# Altium PCB FURNACE.PcbDoc (part 1 of 2)
Units mm, origin at the board's own origin, x right, y up, seen from the top; angles counter-clockwise.
Board outline 97.9 x 85.9 mm, 2 copper layers (Top Layer, Bottom Layer); 165 components, 104 nets, 476 pads, 472 vias.
Unrouted connection lines stored in the file: 26.
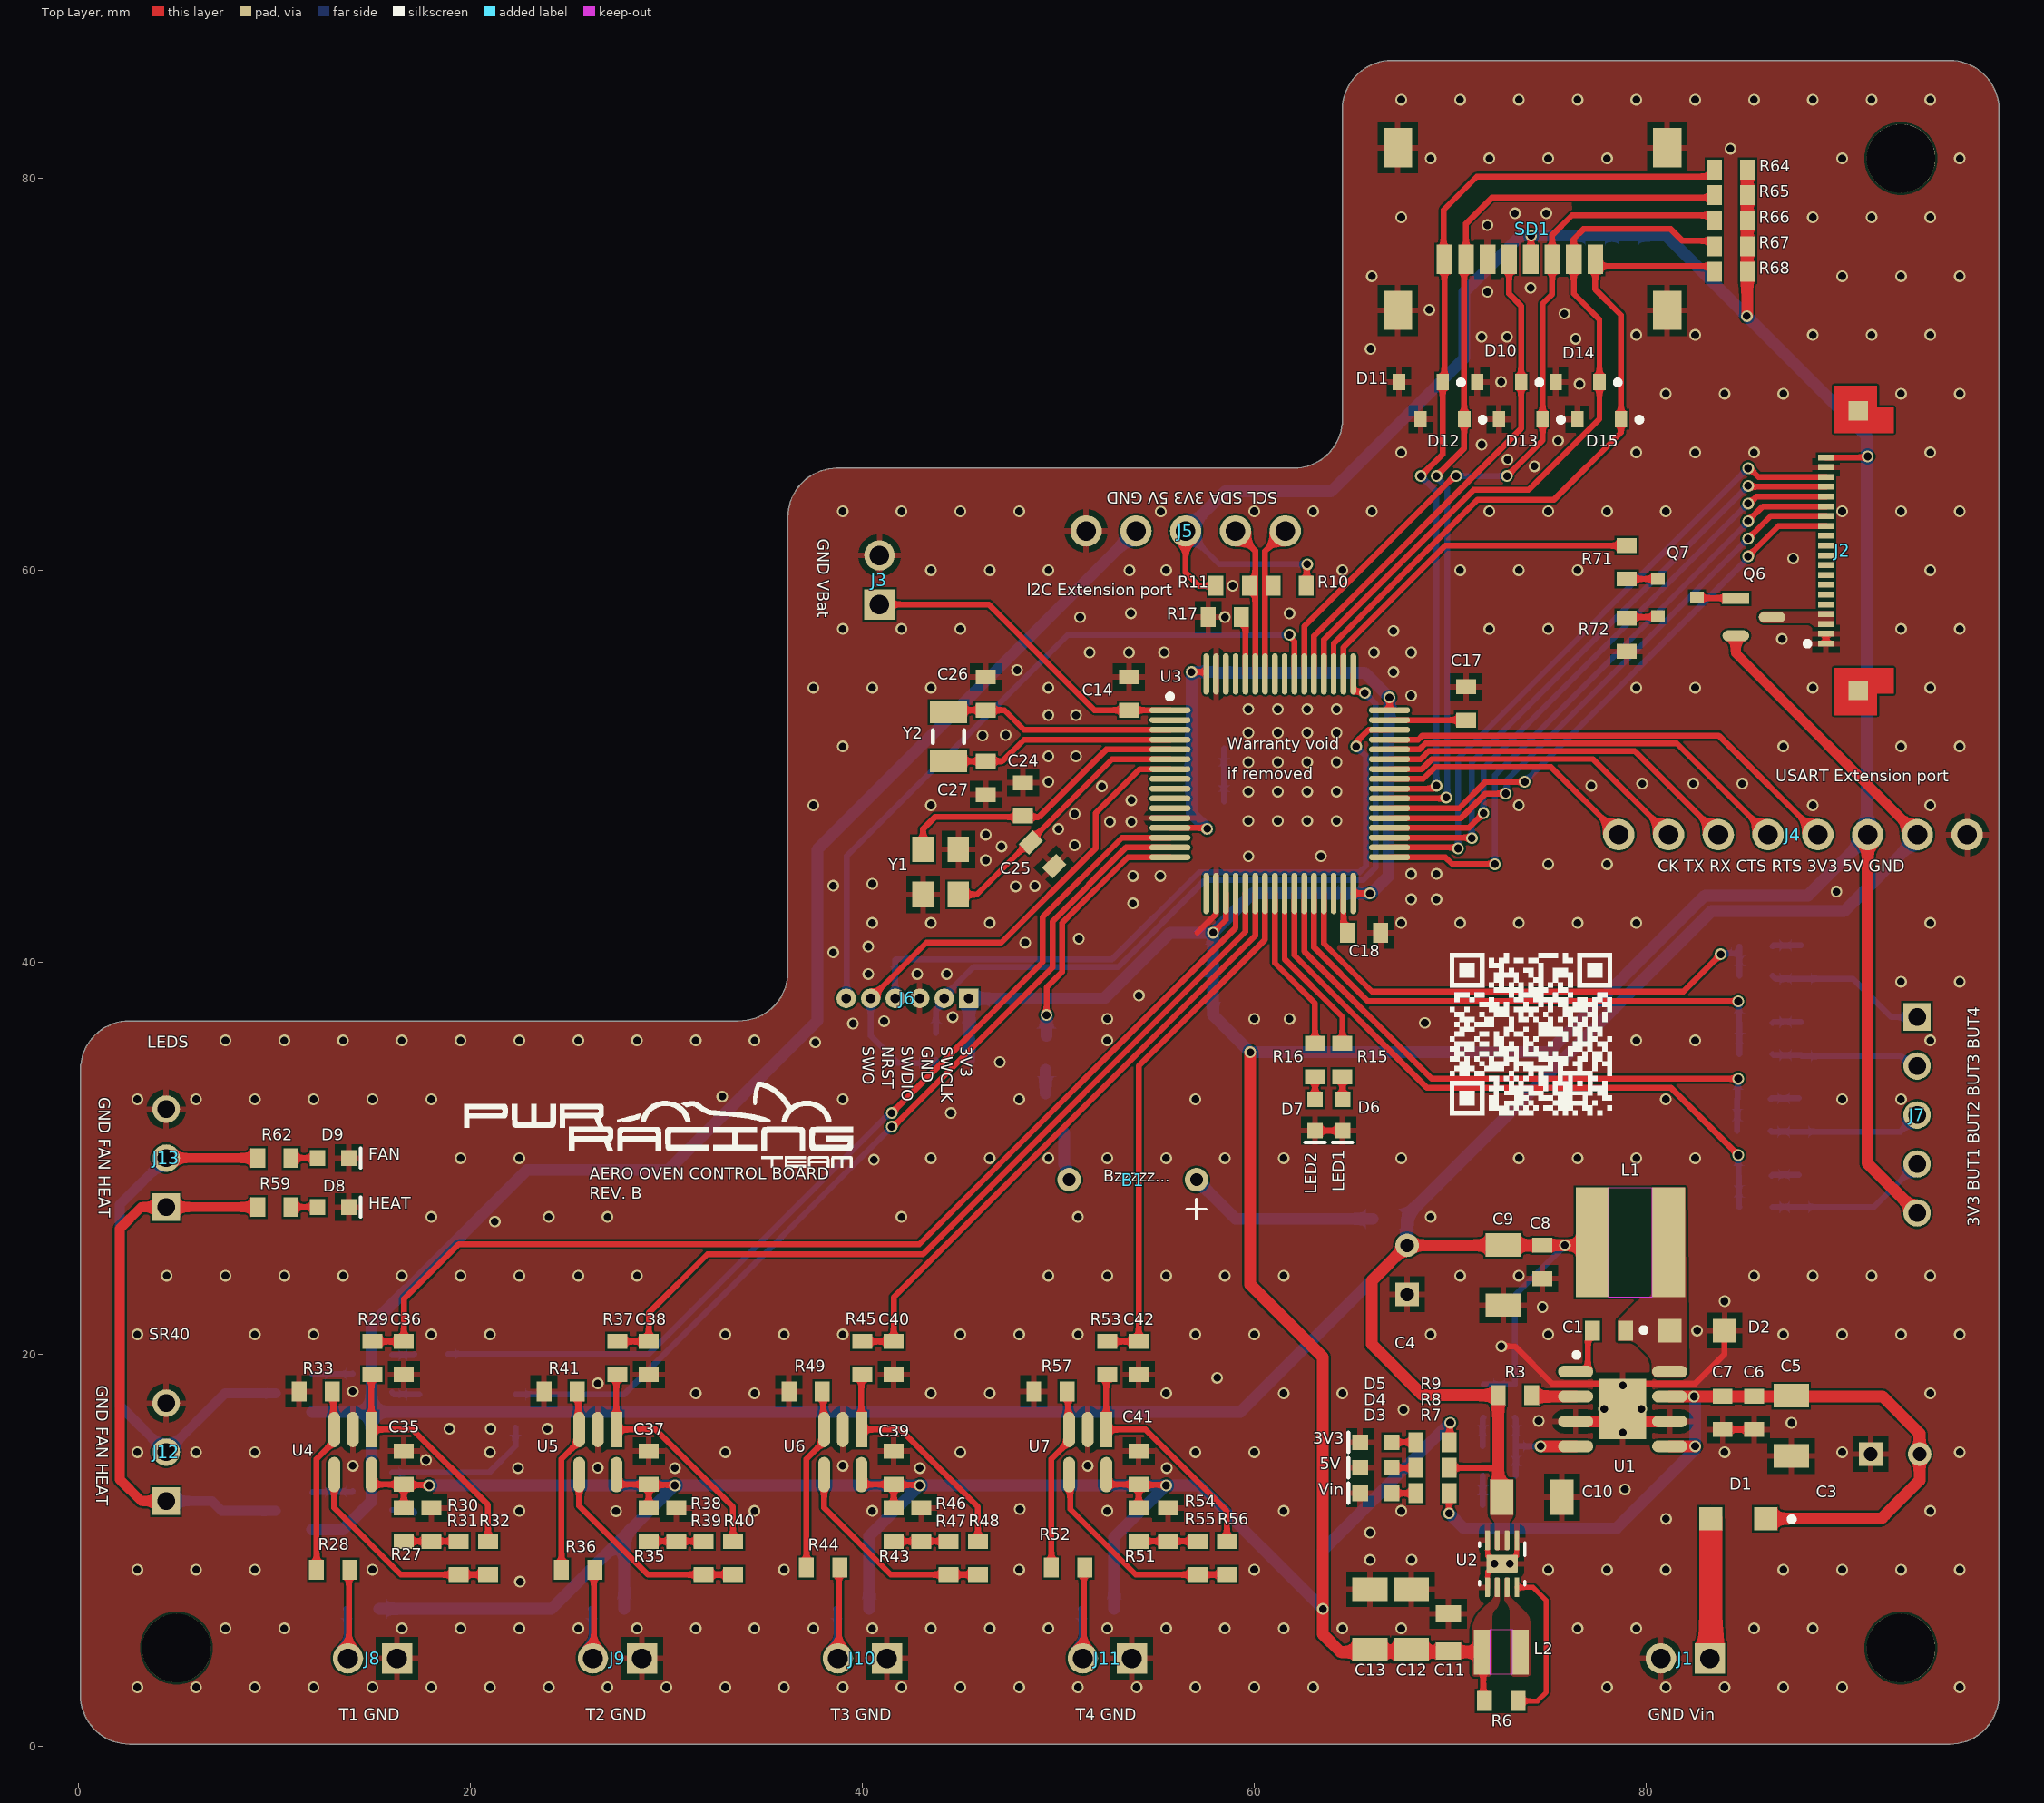
[diagram p0: Top Layer view]
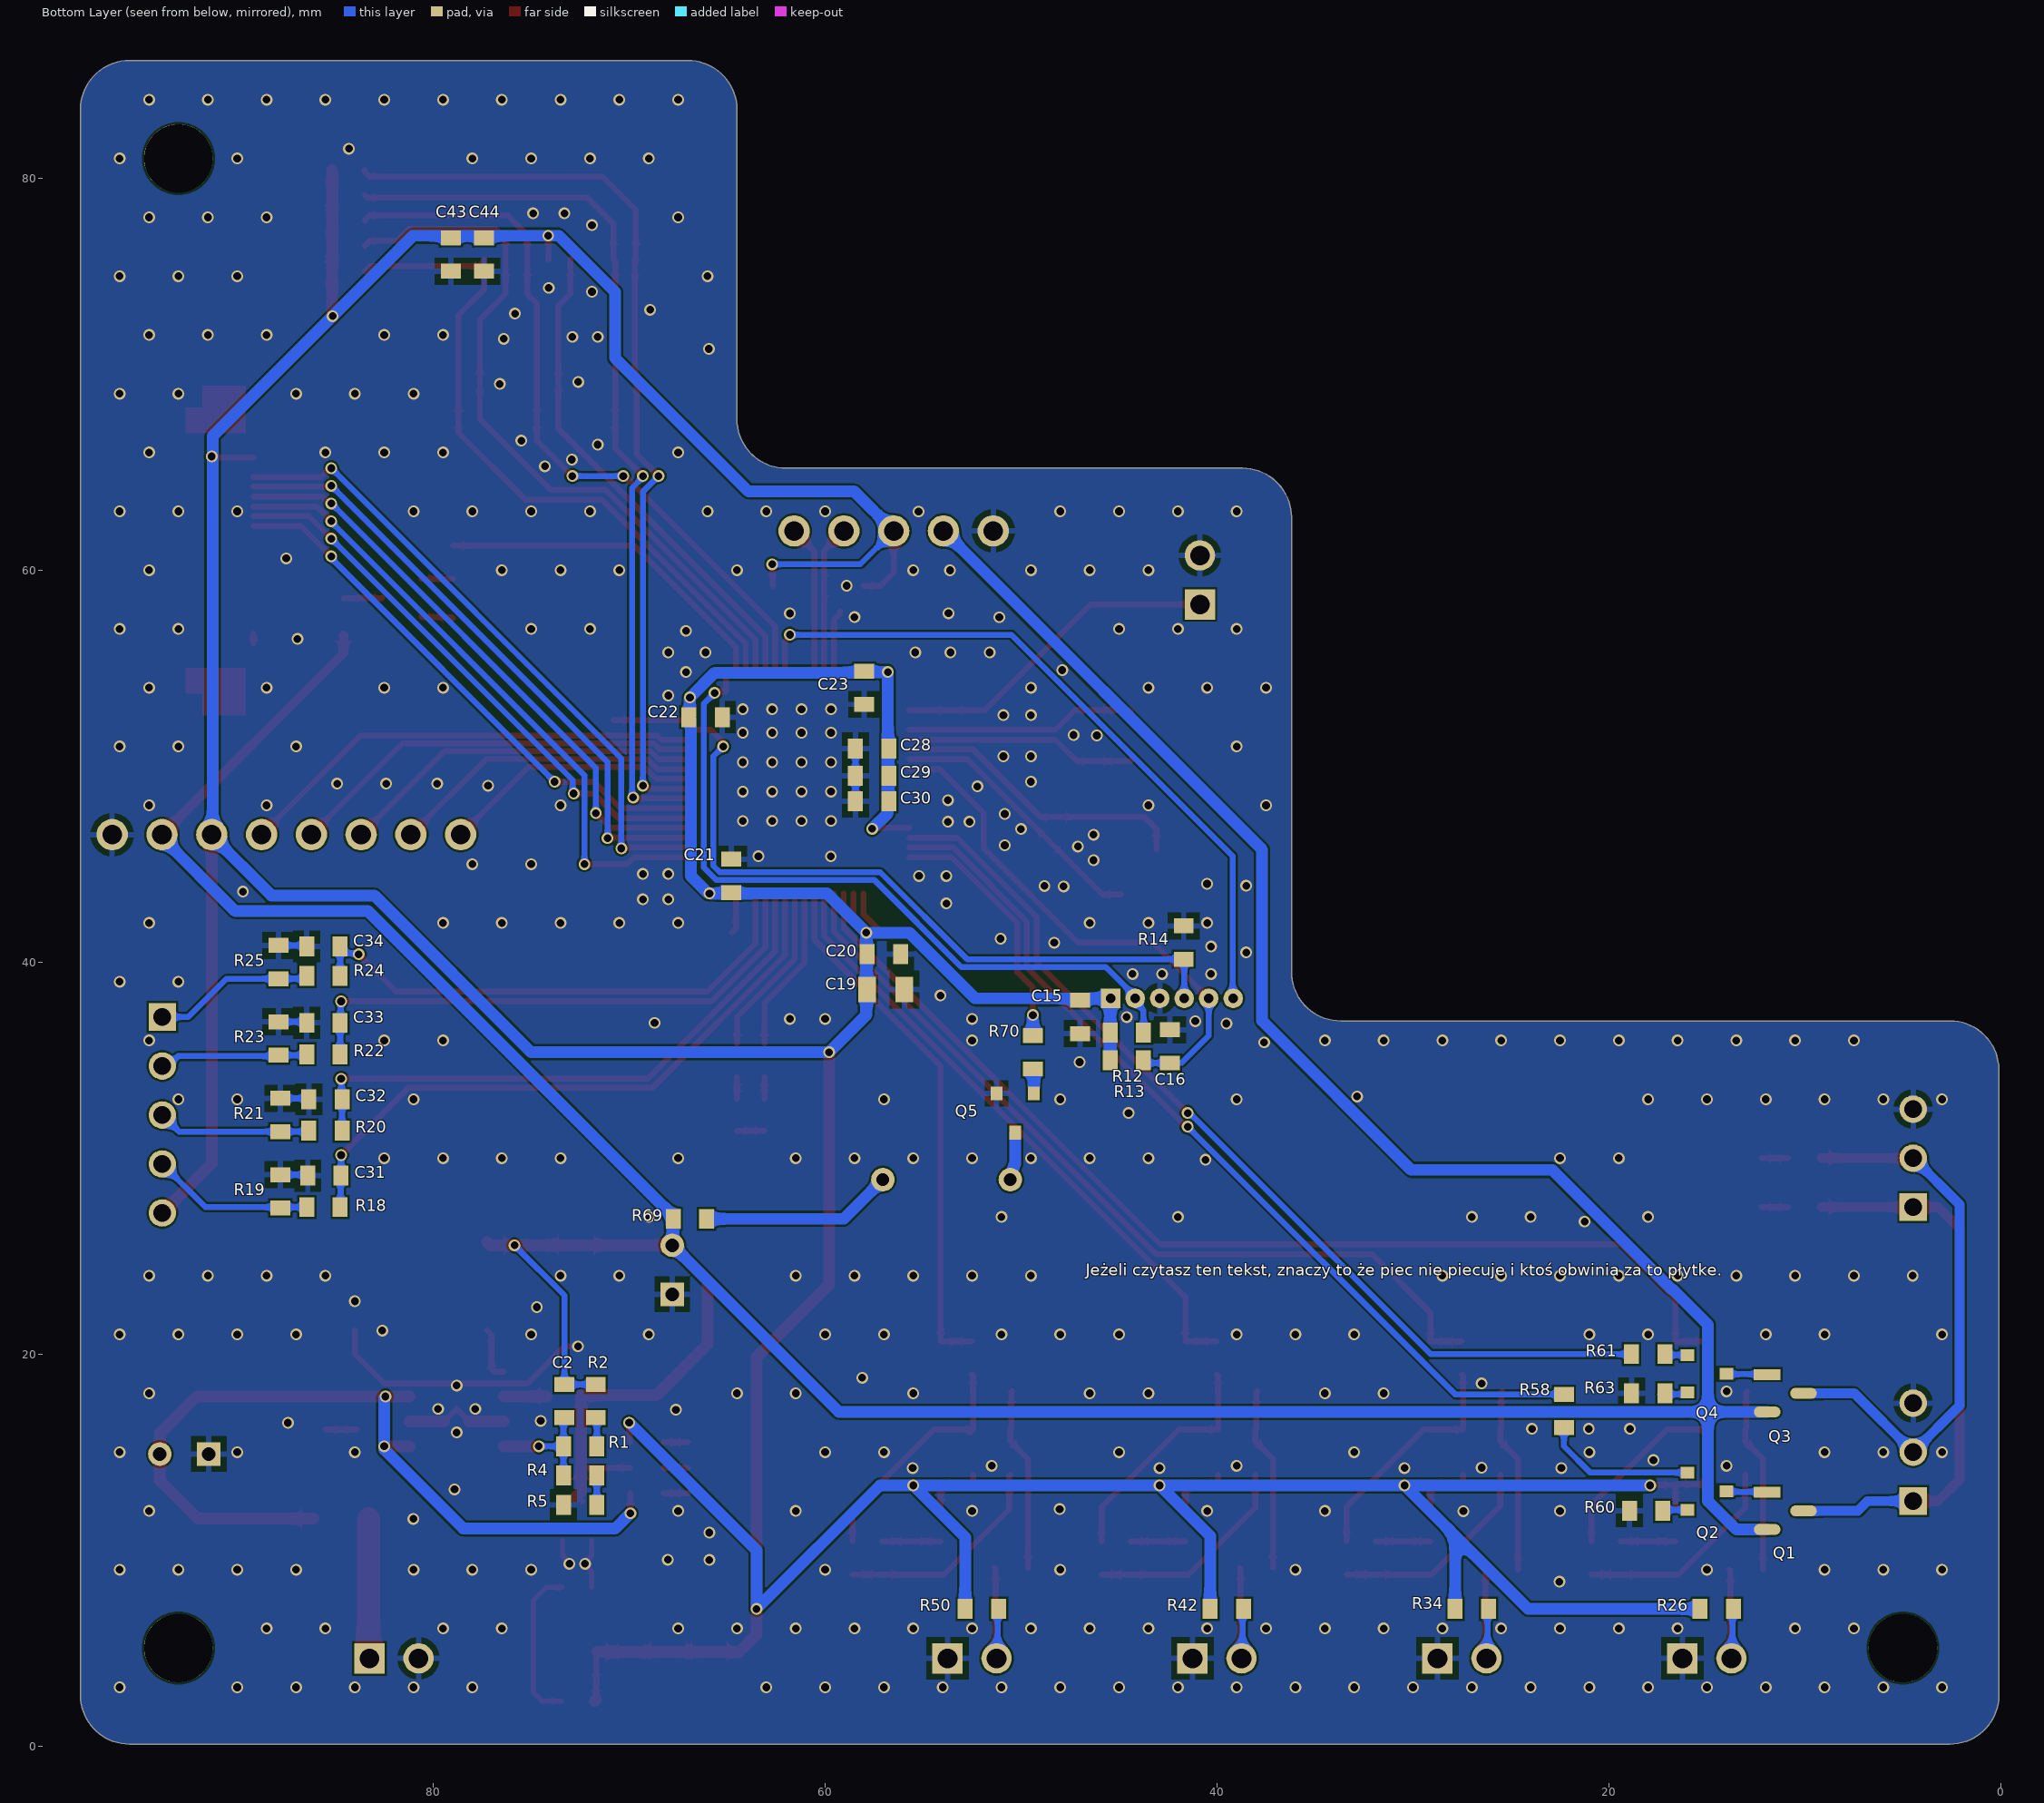
[diagram p1: Bottom Layer view, seen from below]
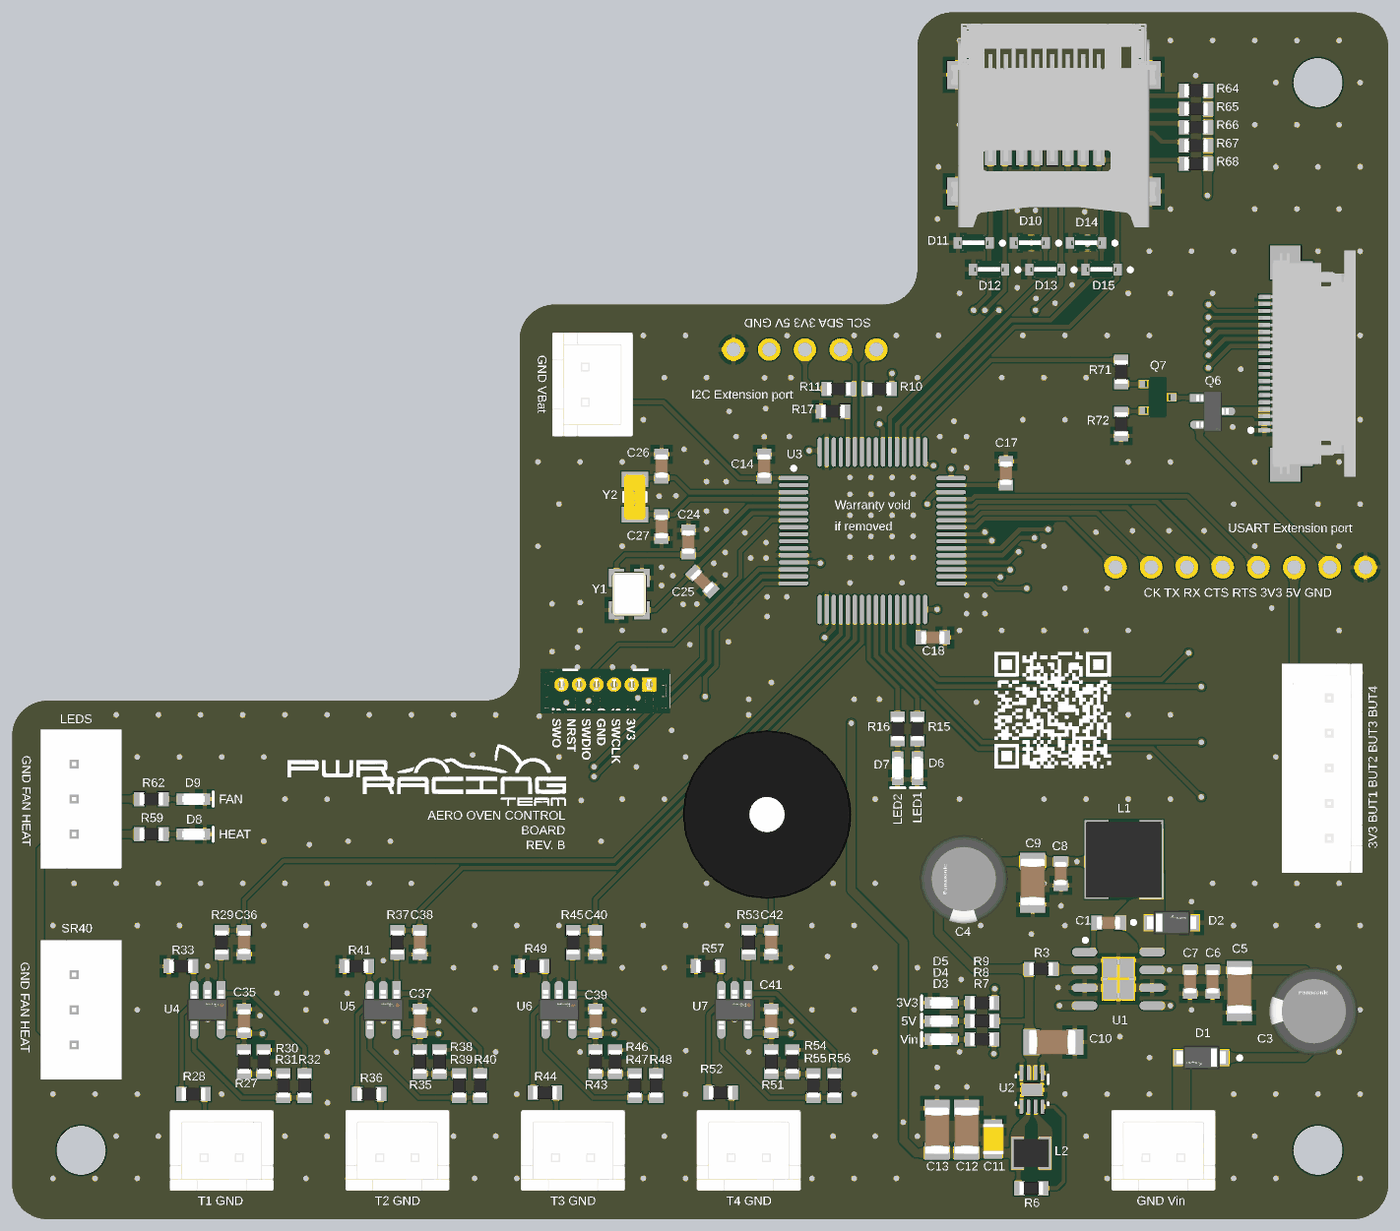
[diagram p3: 3D render of the assembled board from above, using the file's embedded part models]
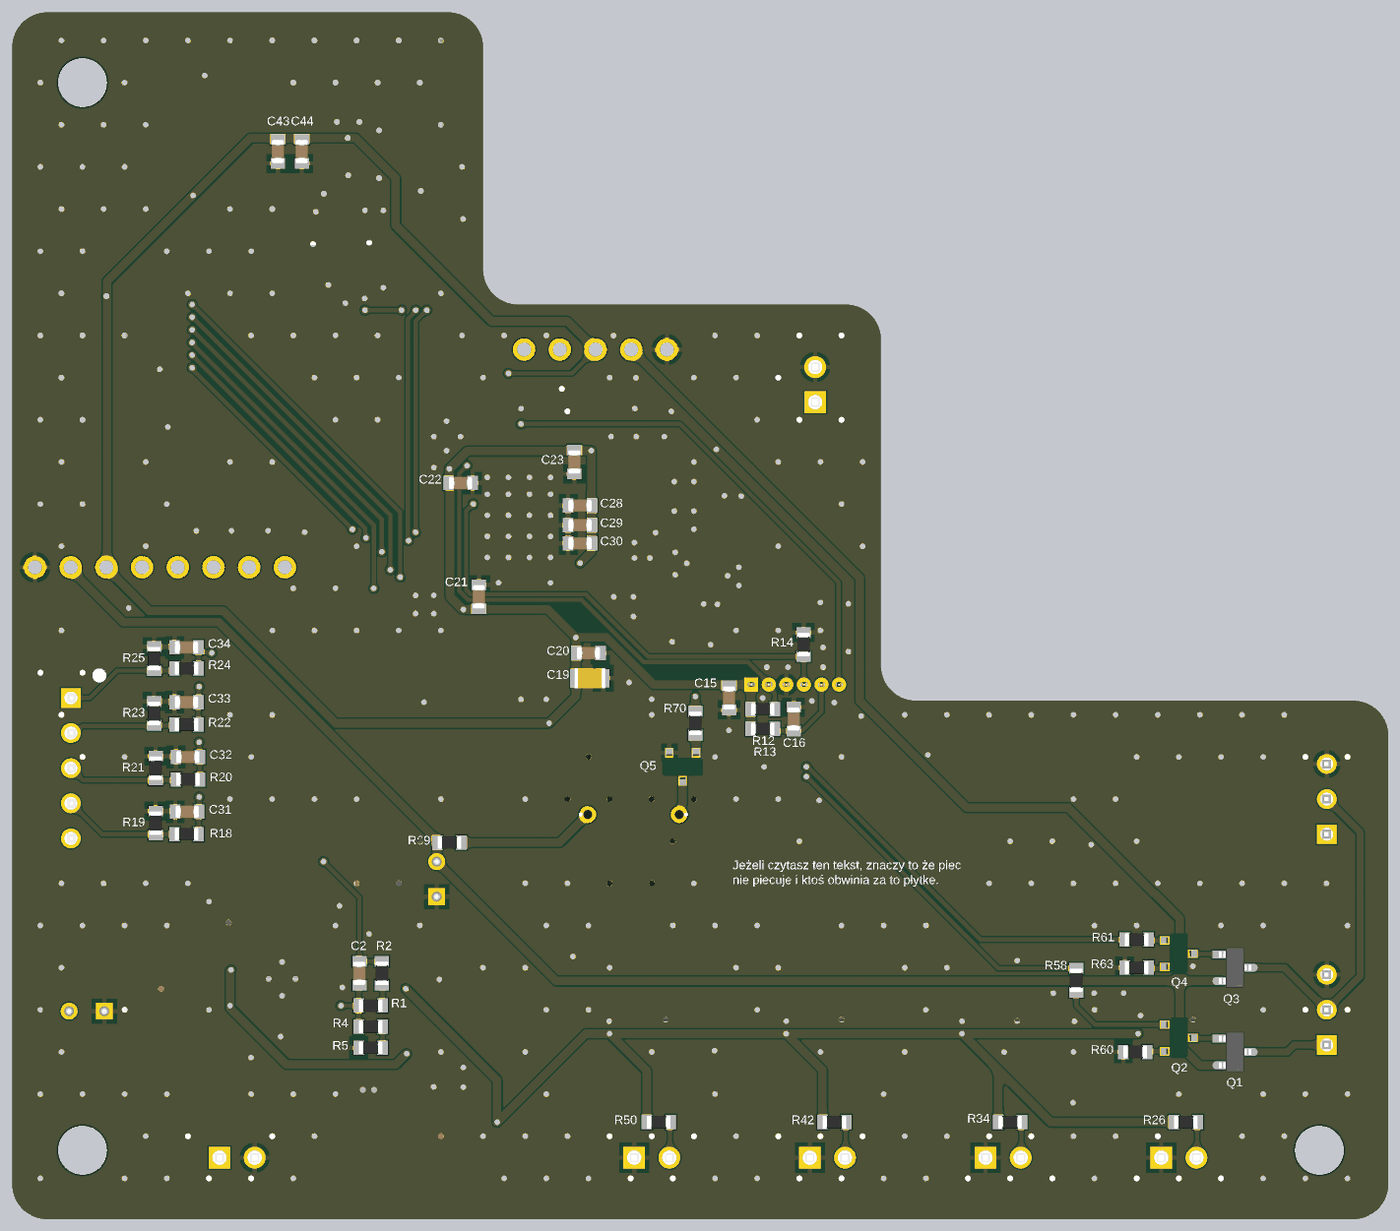
[diagram p4: 3D render of the assembled board from below, using the file's embedded part models]

## Layer stack, top to bottom
Top Solder: solder mask 0.0102, Solder Resist, Dk 3.5
Top Layer: signal copper 0.0356
Dielectric 1: dielectric 0.32, FR-4, Dk 4.8
Bottom Layer: signal copper 0.0356
Bottom Solder: solder mask 0.0102, Solder Resist, Dk 3.5

## Board outline
0.1,2.6 0.1,34.5 cw(c2.6,34.5) 2.6,37 33.7,37 ccw(c33.7,39.5) 36.2,39.5 36.2,62.7 cw(c38.7,62.7) 38.7,65.2 62,65.2 ccw(c62,67.7) 64.5,67.7 64.5,83.5 cw(c67,83.5) 67,86 95.5,86 cw(c95.5,83.5) 98,83.5 98,2.6 cw(c95.5,2.6) 95.5,0.1 2.6,0.1 cw(c2.6,2.6)

## Design rules (kind name [scope] priority, off if disabled: settings)
Clearance [All] p1: gap=0.1 ignorepadtopadclearanceinfootprint=FALSE
DiffPairsRouting [All] p1: maxlimit=0.254 minlimit=0.15 mostfreqgap=0.2 toplayer_minwidth=0.25 toplayer_maxwidth=0.381 toplayer_prefwidth=0.3 bottomlayer_minwidth=0.25 bottomlayer_maxwidth=0.381 bottomlayer_prefwidth=0.3 maxuncoupledlength=12.7
HoleSize [All] p1: absolutevalues=TRUE maxlimit=5 minlimit=0.4 maxpercent=80.000 minpercent=20.000
HoleToHoleClearance [All] p1: gap=0.2 allowstackedmicrovias=TRUE
MinimumSolderMaskSliver [All] p1: minsoldermaskwidth=0.1
PlaneClearance [All] p1: clearance=0.5
PlaneConnect [All] p1: planeconnectstyle=Relief reliefexpansion=0.5 reliefentries=4 reliefconductorwidth=0.3 reliefairgap=0.2
PolygonConnect GND_polygon [InNet('GND')] p1: thpad.connectstyle=Relief thpad.reliefconductorwidth=0.3 thpad.reliefentries=4 thpad.polygonreliefangle="90 Angle" thpad.airgapwidth=0.3 smdpad.connectstyle=Relief smdpad.reliefconductorwidth=0.3 smdpad.reliefentries=4 smdpad.polygonreliefangle="90 Angle" smdpad.airgapwidth=0.3 via.connectstyle=Direct via.reliefconductorwidth=0.2 via.reliefentries=4 via.polygonreliefangle="90 Angle" via.airgapwidth=0.2
PolygonConnect normal [All] p2: connectstyle=Direct reliefconductorwidth=0.254 reliefentries=4 polygonreliefangle="90 Angle" airgapwidth=0.254
RoutingVias [All] p1: holewidth=0.4 width=0.6 viastyle="Through Hole" minholewidth=0.4 minwidth=0.6 maxholewidth=1 maxwidth=2
SilkToSilkClearance [All] p1: silktosilkclearance=0.1
SilkToSolderMaskClearance [IsPad] p1: minsilkscreentomaskgap=0.1 clearancetoexposedcopper=TRUE
SolderMaskExpansion [All] p1: expansion=0.04 istentingtop=FALSE
SupplyNets "Schematic Supply Nets_4" [InNet('VBat_IN')] p1: voltage=0.000
SupplyNets "Schematic Supply Nets" [InNet('3V3')] p2: voltage=0.000
SupplyNets "Schematic Supply Nets_3" [InNet('5V')] p3: voltage=0.000
SupplyNets "Schematic Supply Nets_2" [InNet('GND')] p4: voltage=0.000
Width [All] p1: maxlimit=2 minlimit=0.1 preferedwidth=0.3
22 further rules are at their usual default settings.

## Classes and differential pairs
component class LCD_BACKLIGHT_5V: Q6 Q7 R71 R72
component class Buzzer: Q5 R69 R70
component class "Temp sensors": C35 C36 C37 C38 C39 C40 C41 C42 J8 J9 J10 J11 R26 R27 R28 R29 R30 R31 R32 R33 R34 R35 R36 R37 R38 R39 R40 R41 R42 R43 R44 R45 R46 R47 R48 R49 R50 R51 R52 R53 R54 R55 R56 R57 U4 U5 U6 U7
component class STM32: C15 C16 C17 C18 C19 C20 C21 C22 C23 C24 C25 C26 C27 C28 C29 C30 D6 D7 J6 R10 R11 R12 R13 R14 R15 R16 R17 U3 Y1 Y2
component class "SD Card": C43 C44 D10 D11 D12 D13 D14 D15 R64 R65 R66 R67 R68 SD1
component class "Power Supply": C1 C2 C3 C4 C5 C6 C7 C8 C9 C10 C11 C12 C13 C14 D1 D2 D3 D4 D5 L1 L2 R1 R2 R3 R4 R5 R6 R7 R8 R9 U1 U2
component class "Power relay": D8 D9 J12 J13 Q1 Q2 Q3 Q4 R58 R59 R60 R61 R62 R63
component class MAIN_SCHEMATIC: J2 J3 J4 J5
component class "Control buttons": C31 C32 C33 C34 J7 R18 R19 R20 R21 R22 R23 R24 R25
differential pair OSC32: +OSC32_P -OSC32_N
differential pair PH: +PH_P -PH_N

## Components (designator, comment, footprint, x,y, rotation, side; value= is the part's Value field where it differs from the comment)
B1 "Buzzer" Buzzer 53.8,28.9 r180 top
C1 "SMD 0603 Capacitor" CAPACITOR_SMD_0603 78.1,21.2 r270 top
C2 "SMD 0603 Capacitor" CAPACITOR_SMD_0603 73.3,17.6 r180 bottom
C3 "EEU-FR1J470" FP-EEU-FR1J470-MFG 92.7,14.9 r0 top
C4 "EEU-FR1J470" FP-EEU-FR1J470-MFG 67.8,24.3 r90 top
C5 "SMD 1206 Capacitor" CAPACITOR_SMD_1206 87.4,16.4 r180 top
C6 "SMD 0603 Capacitor" CAPACITOR_SMD_0603 85.5,17 r180 top
C7 "SMD 0603 Capacitor" CAPACITOR_SMD_0603 83.9,17 r180 top
C8 "SMD 0603 Capacitor" CAPACITOR_SMD_0603 74.7,24.7 r180 top
C9 "SMD 1206 Capacitor" CAPACITOR_SMD_1206 72.7,24.1 r180 top
C10 "SMD 1206 Capacitor" CAPACITOR_SMD_1206 74.1,12.7 r270 top
C11 "SMD 0805 Capacitor" CAPACITOR_SMD_0805_IPC 69.9,5.8 r90 top
C12 "SMD 1206 Capacitor" CAPACITOR_SMD_1206 68,6.4 r0 top
C13 "SMD 1206 Capacitor" CAPACITOR_SMD_1206 65.9,6.4 r0 top
C14 "SMD 0603 Capacitor" CAPACITOR_SMD_0603 53.6,53.7 r0 top
C15 "SMD 0603 Capacitor" CAPACITOR_SMD_0603 47,37.2 r0 bottom
C16 "SMD 0603 Capacitor" CAPACITOR_SMD_0603 42.4,35.7 r180 bottom
C17 "SMD 0603 Capacitor" CAPACITOR_SMD_0603 70.8,53.2 r0 top
C18 "SMD 0603 Capacitor" CAPACITOR_SMD_0603 65.6,41.5 r270 top
C19 "SMD 0805 Capacitor" CAPACITOR_SMD_0805_IPC 56.9,38.6 r180 bottom
C20 "SMD 0603 Capacitor" CAPACITOR_SMD_0603 57,40.4 r270 bottom
C21 "SMD 0603 Capacitor" CAPACITOR_SMD_0603 64.8,44.4 r180 bottom
C22 "SMD 0603 Capacitor" CAPACITOR_SMD_0603 66.1,52.5 r270 bottom
C23 "SMD 0603 Capacitor" CAPACITOR_SMD_0603 58,54 r0 bottom
C24 "SMD 0603 Capacitor" CAPACITOR_SMD_0603 48.2,48.3 r0 top
C25 "SMD 0603 Capacitor" CAPACITOR_SMD_0603 49.2,45.5 r225 top
C26 "SMD 0603 Capacitor" CAPACITOR_SMD_0603 46.3,53.7 r0 top
C27 "SMD 0603 Capacitor" CAPACITOR_SMD_0603 46.3,49.4 r180 top
C28 "SMD 0603 Capacitor" CAPACITOR_SMD_0603 57.6,50.9 r90 bottom
C29 "SMD 0603 Capacitor" CAPACITOR_SMD_0603 57.6,49.5 r90 bottom
C30 "SMD 0603 Capacitor" CAPACITOR_SMD_0603 57.6,48.2 r90 bottom
C31 "SMD 0603 Capacitor" CAPACITOR_SMD_0603 85.55,29.1 r90 bottom
C32 "SMD 0603 Capacitor" CAPACITOR_SMD_0603 85.5,33 r90 bottom
C33 "SMD 0603 Capacitor" CAPACITOR_SMD_0603 85.6,36.9 r90 bottom
C34 "SMD 0603 Capacitor" CAPACITOR_SMD_0603 85.6,40.8 r90 bottom
C35 "SMD 0603 Capacitor" CAPACITOR_SMD_0603 16.6,14.2 r0 top
C36 "SMD 0603 Capacitor" CAPACITOR_SMD_0603 16.6,19.8 r180 top
C37 "SMD 0603 Capacitor" CAPACITOR_SMD_0603 29.1,14.2 r0 top
C38 "SMD 0603 Capacitor" CAPACITOR_SMD_0603 29.1,19.8 r180 top
C39 "SMD 0603 Capacitor" CAPACITOR_SMD_0603 41.6,14.2 r0 top
C40 "SMD 0603 Capacitor" CAPACITOR_SMD_0603 41.6,19.8 r180 top
C41 "SMD 0603 Capacitor" CAPACITOR_SMD_0603 54.1,14.2 r0 top
C42 "SMD 0603 Capacitor" CAPACITOR_SMD_0603 54.1,19.8 r180 top
C43 "SMD 0603 Capacitor" CAPACITOR_SMD_0603 79.1,76.1 r0 bottom
C44 "SMD 0603 Capacitor" CAPACITOR_SMD_0603 77.4,76.1 r0 bottom
D1 "PMEG4030ER,115" FP-SOD123W-MFG 84.7,11.6 r180 top
D2 "PMEG4030ER,115" FP-SOD123W-MFG 82.6,21.2 r0 top
D3 "SMD LED 0603" "0603 LED" 66.2,12.9 r90 top
D4 "SMD LED 0603" "0603 LED" 66.2,14.2 r90 top
D5 "SMD LED 0603" "0603 LED" 66.2,15.5 r90 top
D6 "SMD LED 0603" "0603 LED" 64.5,32.2 r180 top
D7 "SMD LED 0603" "0603 LED" 63.1,32.2 r180 top
D8 "SMD LED 0603" "0603 LED" 13,27.5 r270 top
D9 "SMD LED 0603" "0603 LED" 13,30 r270 top
D10 "ESD7351HT1G" FP-477-02-MFG 72.5,69.6 r180 top
D11 "ESD7351HT1G" FP-477-02-MFG 68.5,69.6 r180 top
D12 "ESD7351HT1G" FP-477-02-MFG 69.6,67.7 r180 top
D13 "ESD7351HT1G" FP-477-02-MFG 73.6,67.7 r180 top
D14 "ESD7351HT1G" FP-477-02-MFG 76.5,69.6 r180 top
D15 "ESD7351HT1G" FP-477-02-MFG 77.6,67.7 r180 top
J1 "B2B-XH-A(LF)(SN)" FP-B2B-XH-A_LF_SN-MFG 82,5 r180 top
J2 "52746-2071" MOLX-52746-2071 90,61 r90 top
J3 "B2B-XH-A(LF)(SN)" FP-B2B-XH-A_LF_SN-MFG 41.4,59.5 r90 top
J4 "NSL254M-8G" NSL254M-8G 87.49,46.5 r0 top
J5 "NSL254M-5G" NSL254M-5G 56.5,62 r180 top
J6 "530470610" FP-530470610-MFG 42.3,37.7 r0 top
J7 "B5B-XH-AM(LF)(SN)" FP-B5B-XH-AM_LF_SN-MFG 93.3,32.2 r90 top
J8 "B2B-XH-A(LF)(SN)" FP-B2B-XH-A_LF_SN-MFG 15,5 r180 top
J9 "B2B-XH-A(LF)(SN)" FP-B2B-XH-A_LF_SN-MFG 27.5,5 r180 top
J10 "B2B-XH-A(LF)(SN)" FP-B2B-XH-A_LF_SN-MFG 40,5 r180 top
J11 "B2B-XH-A(LF)(SN)" FP-B2B-XH-A_LF_SN-MFG 52.5,5 r180 top
J12 "B3B-XH-A(LF)(SN)" FP-B3B-XH-A_LF_SN-MFG 5,15 r90 top
J13 "B3B-XH-A(LF)(SN)" FP-B3B-XH-A_LF_SN-MFG 5,30 r90 top
L1 "74438367100" WE-MAPI_5030 79.2,25.7 r180 top
L2 "74438323022" WE-MAPI_2510 72.6,4.8 r180 top
Q1 "BC807-40,215" FP-SOT23-IPC_B 11,12 r180 bottom
Q2 "BC817-40,215" FP-SOT23-MFG 15,13 r180 bottom
Q3 "BC807-40,215" FP-SOT23-IPC_B 11,18 r180 bottom
Q4 "BC817-40,215" FP-SOT23-MFG 15,19 r180 bottom
Q5 "BC817-40,215" FP-SOT23-MFG 50.3,32.3 r270 bottom
Q6 "BC807-40,215" FP-SOT23-IPC_B 85.5,57.6 r0 top
Q7 "BC817-40,215" FP-SOT23-MFG 81.6,58.6 r0 top
R1 "SMD 0603 Resistor" RESISTOR_SMD_0603 72.5,15.3 r270 bottom
R2 "SMD 0603 Resistor" RESISTOR_SMD_0603 71.7,17.6 r180 bottom
R3 "SMD 0603 Resistor" RESISTOR_SMD_0603 73.3,17.9 r90 top
R4 "SMD 0603 Resistor" RESISTOR_SMD_0603 72.5,13.8 r90 bottom
R5 "SMD 0603 Resistor" RESISTOR_SMD_0603 72.5,12.3 r270 bottom
R6 "SMD 0603 Resistor" RESISTOR_SMD_0603 72.6,2.3 r90 top
R7 "SMD 0603 Resistor" RESISTOR_SMD_0603 69.1,12.9 r270 top
R8 "SMD 0603 Resistor" RESISTOR_SMD_0603 69.1,14.2 r270 top
R9 "SMD 0603 Resistor" RESISTOR_SMD_0603 69.1,15.5 r270 top
R10 "SMD 0603 Resistor" RESISTOR_SMD_0603 61.8,59.2 r270 top
R11 "SMD 0603 Resistor" RESISTOR_SMD_0603 58.9,59.2 r90 top
R12 "SMD 0603 Resistor" RESISTOR_SMD_0603 44.6,36.4 r90 bottom
R13 "SMD 0603 Resistor" RESISTOR_SMD_0603 44.6,35 r90 bottom
R14 "SMD 0603 Resistor" RESISTOR_SMD_0603 41.7,41 r0 bottom
R15 "SMD 0603 Resistor" RESISTOR_SMD_0603 64.5,35 r0 top
R16 "SMD 0603 Resistor" RESISTOR_SMD_0603 63.1,35 r0 top
R17 "SMD 0603 Resistor" RESISTOR_SMD_0603 58.5,57.6 r270 top
R18 "SMD 0603 Resistor" RESISTOR_SMD_0603 85.6,27.5 r270 bottom
R19 "SMD 0603 Resistor" RESISTOR_SMD_0603 87.8,28.3 r0 bottom
R20 "SMD 0603 Resistor" RESISTOR_SMD_0603 85.5,31.4 r270 bottom
R21 "SMD 0603 Resistor" RESISTOR_SMD_0603 87.8,32.2 r0 bottom
R22 "SMD 0603 Resistor" RESISTOR_SMD_0603 85.6,35.3 r270 bottom
R23 "SMD 0603 Resistor" RESISTOR_SMD_0603 87.9,36.1 r0 bottom
R24 "SMD 0603 Resistor" RESISTOR_SMD_0603 85.6,39.3 r270 bottom
R25 "SMD 0603 Resistor" RESISTOR_SMD_0603 87.9,40 r0 bottom
R26 "SMD 0603 Resistor" RESISTOR_SMD_0603 14.5,7 r90 bottom
R27 "SMD 0603 Resistor" RESISTOR_SMD_0603 16.6,11.3 r180 top
R28 "SMD 0603 Resistor" RESISTOR_SMD_0603 13,9 r90 top
R29 "SMD 0603 Resistor" RESISTOR_SMD_0603 15,19.8 r0 top
R30 "SMD 0603 Resistor" RESISTOR_SMD_0603 18,11.3 r180 top
R31 "SMD 0603 Resistor" RESISTOR_SMD_0603 19.4,9.6 r180 top
R32 "SMD 0603 Resistor" RESISTOR_SMD_0603 20.9,9.6 r0 top
R33 "SMD 0603 Resistor" RESISTOR_SMD_0603 12.1,18.1 r270 top
R34 "SMD 0603 Resistor" RESISTOR_SMD_0603 27,7 r90 bottom
R35 "SMD 0603 Resistor" RESISTOR_SMD_0603 29.1,11.3 r180 top
R36 "SMD 0603 Resistor" RESISTOR_SMD_0603 25.5,9 r90 top
R37 "SMD 0603 Resistor" RESISTOR_SMD_0603 27.5,19.8 r0 top
R38 "SMD 0603 Resistor" RESISTOR_SMD_0603 30.5,11.3 r180 top
R39 "SMD 0603 Resistor" RESISTOR_SMD_0603 31.9,9.6 r180 top
R40 "SMD 0603 Resistor" RESISTOR_SMD_0603 33.4,9.6 r0 top
R41 "SMD 0603 Resistor" RESISTOR_SMD_0603 24.6,18.1 r270 top
R42 "SMD 0603 Resistor" RESISTOR_SMD_0603 39.5,7 r90 bottom
R43 "SMD 0603 Resistor" RESISTOR_SMD_0603 41.6,11.3 r180 top
R44 "SMD 0603 Resistor" RESISTOR_SMD_0603 38,9.1 r90 top
R45 "SMD 0603 Resistor" RESISTOR_SMD_0603 40,19.8 r0 top
R46 "SMD 0603 Resistor" RESISTOR_SMD_0603 43,11.3 r180 top
R47 "SMD 0603 Resistor" RESISTOR_SMD_0603 44.4,9.6 r180 top
R48 "SMD 0603 Resistor" RESISTOR_SMD_0603 45.9,9.6 r0 top
R49 "SMD 0603 Resistor" RESISTOR_SMD_0603 37.1,18.1 r270 top
R50 "SMD 0603 Resistor" RESISTOR_SMD_0603 52,7 r90 bottom
R51 "SMD 0603 Resistor" RESISTOR_SMD_0603 54.1,11.3 r180 top
R52 "SMD 0603 Resistor" RESISTOR_SMD_0603 50.5,9.1 r90 top
R53 "SMD 0603 Resistor" RESISTOR_SMD_0603 52.5,19.8 r0 top
R54 "SMD 0603 Resistor" RESISTOR_SMD_0603 55.6,11.3 r180 top
R55 "SMD 0603 Resistor" RESISTOR_SMD_0603 57.1,9.6 r180 top
R56 "SMD 0603 Resistor" RESISTOR_SMD_0603 58.6,9.6 r0 top
R57 "SMD 0603 Resistor" RESISTOR_SMD_0603 49.6,18.1 r270 top
R58 "SMD 0603 Resistor" RESISTOR_SMD_0603 22.3,17.1 r0 bottom
R59 "SMD 0603 Resistor" RESISTOR_SMD_0603 10,27.5 r90 top
R60 "SMD 0603 Resistor" RESISTOR_SMD_0603 18.1,12 r270 bottom
R61 "SMD 0603 Resistor" RESISTOR_SMD_0603 18,20 r270 bottom
R62 "SMD 0603 Resistor" RESISTOR_SMD_0603 10,30 r90 top
R63 "SMD 0603 Resistor" RESISTOR_SMD_0603 18,18 r270 bottom
R64 "SMD 0603 Resistor" RESISTOR_SMD_0603 84.325,80.425 r270 top
R65 "SMD 0603 Resistor" RESISTOR_SMD_0603 84.325,79.125 r270 top
R66 "SMD 0603 Resistor" RESISTOR_SMD_0603 84.325,77.825 r270 top
R67 "SMD 0603 Resistor" RESISTOR_SMD_0603 84.325,76.525 r270 top
R68 "SMD 0603 Resistor" RESISTOR_SMD_0603 84.325,75.225 r270 top
R69 "SMD 0603 Resistor" RESISTOR_SMD_0603 66.9,26.9 r270 bottom
R70 "SMD 0603 Resistor" RESISTOR_SMD_0603 49.4,35.4 r0 bottom
R71 "SMD 0603 Resistor" RESISTOR_SMD_0603 79,60.4 r180 top
R72 "SMD 0603 Resistor" RESISTOR_SMD_0603 79,56.7 r0 top
SD1 "47219-2001" MOLX-47219-2001-8_V 74.2,77.4 r180 top
U1 "ST1S14PHR" HSO-8_L 78.8,17.2 r0 top
U2 "TPS62162QDSRQ1" DSG0008A_V 72.65,9.3 r270 top
U3 "STM32F405RGT6" STM-LQFP64_M 61.3,49.1 r0 top
U4 "OPA348AIDBVR" FP-DBV0005A-IPC_A 14,15 r270 top
U5 "OPA348AIDBVR" FP-DBV0005A-IPC_A 26.5,15 r270 top
U6 "OPA348AIDBVR" FP-DBV0005A-IPC_A 39,15 r270 top
U7 "OPA348AIDBVR" FP-DBV0005A-IPC_A 51.5,15 r270 top
Y1 "3225-16M-SR" 3225-16M-SR 44,44.6 r270 top
Y2 "CFPX-217" FP-ABS07-MFG 44.4,51.5 r270 top
? "LOGO" PWR_logo_20x4.5 29.6,31.7 r0 top

## Footprints (in the part's own frame and the unit in brackets; to place one, negate y for a bottom-side part, rotate by r counter-clockwise, add the part's x,y. Pads: shape width x height; smd on the part's side, far side on the other; paste and mask are expansions set on the pad)
"0603 LED" [mm] "standard 0603 LED"
  rect 0.8x0.8 smd: 1(0,-0.8) 2(0,0.8)
  silkscreen extent -0.5,1.4 0.5,1.4, body extent -0.4,-0.8 0.4,0.8, height 0.7
3225-16M-SR [mm] "2.5 x 3.2 16MHz crystal"
  rect 1.3x1.1 smd: 1(-1.15,-0.9) 2(1.15,-0.9) 3(1.15,0.9) 4(-1.15,0.9)
  body extent -1.6,-1.25 1.6,1.25, height 0.61
Buzzer [mm] "12mm"
  round 1.2 hole 0.65: 1(-3.25,0) 2(3.25,0)
  silkscreen extent -3.75,1 -2.75,2, body extent -6,-5.99 6,5.99, height 9.01
CAPACITOR_SMD_0603 [mil]
  rect 40x30 smd: 1(0,-33.46) 2(0,33.46)
  body extent -18,-33 18,33, height 35
CAPACITOR_SMD_0805_IPC [mm] "Chip Capacitor, 2-Leads, Body 2,00x1,25mm, IPC Medium Density"
  rect 0.9x1.3 smd: 1(-0.95,0) 2(0.95,0)
  body extent -1.1,-0.72 1.1,0.72, height 1.45
CAPACITOR_SMD_1206 [mm]
  rect 1.8x1.2 smd: 1(0,-1.475) 2(0,1.6)
  body extent -0.87,-1.68 0.87,1.68, height 1
DSG0008A_V [mm] "SON, 8-Leads, Body 2x2mm, Pitch 0.5mm, Thermal Pad 1.6x0.9mm, TI Recommended"
  rrect40% 1x0.25 smd mask+0.07: 1(-1.2,0.75) 2(-1.2,0.25) 3(-1.2,-0.25) 4(-1.2,-0.75) 5(1.2,-0.75) 6(1.2,-0.25) 7(1.2,0.25) 8(1.2,0.75)
  rrect11% 0.9x1.6 smd paste-0.45 mask+0.07: 9(0,0)
  silkscreen extent -1.07,-1.15 1.07,1.15, body extent -1.05,-1.05 1.05,1.05, height 0.8
FP-477-02-MFG [mm]
  rect 0.63x0.83 smd paste+0 mask+0: 1(-1.115,0) 2(1.115,0)
  silkscreen extent -2.18,-0.1 -1.93,0.15, body extent -1.53,-0.77 1.53,0.77, height 0.25
FP-530470610-MFG [mm]
  rect 1x1 hole 0.5 paste-2539.97 mask+0: 1(3.125,0.45)
  round 1 hole 0.5 paste-2539.97 mask+0: 2(1.875,0.45) 3(0.625,0.45) 4(-0.625,0.45) 5(-1.875,0.45) 6(-3.125,0.45)
  body extent -4.82,-1.8 4.82,1.8, height 0.25
FP-ABS07-MFG [mm]
  rect 1.1x1.9 smd paste+0 mask+0: 1(-1.25,0) 2(1.25,0)
  silkscreen extent -0.33,-0.8 0.33,0.8, body extent -1.9,-1.05 1.9,1.05, height 0.25
FP-B2B-XH-A_LF_SN-MFG [mm]
  rect 1.55x1.55 hole 1 paste-2539.97 mask+0: 1(-1.25,0.525)
  round 1.55 hole 1 paste-2539.97 mask+0: 2(1.25,0.525)
  body extent -3.8,-2.98 3.8,2.98, height 0.25
FP-B3B-XH-A_LF_SN-MFG [mm]
  rect 1.4x1.4 hole 0.9 paste-2539.97 mask+0: 1(-2.5,0.525)
  round 1.4 hole 0.9 paste-2539.97 mask+0: 2(0,0.525) 3(2.5,0.525)
  body extent -5.05,-2.98 5.05,2.98, height 0.25
FP-B5B-XH-AM_LF_SN-MFG [mm]
  rect 1.4x1.4 hole 0.9 paste-2539.97 mask+0: 1(5,-0.525)
  round 1.4 hole 0.9 paste-2539.97 mask+0: 2(2.5,-0.525) 3(0,-0.525) 4(-2.5,-0.525) 5(-5,-0.525)
  body extent -7.55,-2.98 7.55,2.98, height 0.25
FP-DBV0005A-IPC_A [mm]
  rect 1.805x0.612 smd paste+0 mask+0: 1(-1.15,0.95)
  rrect100% 1.805x0.612 smd paste+0 mask+0: 2(-1.15,0) 3(-1.15,-0.95) 4(1.15,-0.95) 5(1.15,0.95)
  body extent -2.55,-1.95 2.55,1.95, height 0.25
FP-EEU-FR1J470-MFG [mm]
  rect 1.2x1.2 hole 0.7 paste-2539.97 mask+0: 1(-1.25,0)
  round 1.2 hole 0.7 paste-2539.97 mask+0: 2(1.25,0)
  body extent -3.5,-3.5 3.5,3.5, height 0.25
FP-SOD123W-MFG [mm]
  rect 1.2x1.2 smd paste-1000 mask+0: 1(-1.4,0) 2(1.4,0)
  silkscreen extent -2.85,-0.1 -2.6,0.15, body extent -2.2,-1.05 2.2,1.05, height 0.25
FP-SOT23-IPC_B [mm]
  rect 1.355x0.562 smd paste+0 mask+0: 1(-0.925,0.95)
  rrect100% 1.355x0.562 smd paste+0 mask+0: 2(-0.925,-0.95) 3(0.925,0)
  body extent -1.15,-1.45 1.15,1.45, height 1.1
FP-SOT23-MFG [mm]
  rect 0.7x0.6 smd paste-1000 mask+0: 1(-1,0.95) 2(-1,-0.95) 3(1,0)
  body extent -1.2,-1.45 1.2,1.45, height 1.1
HSO-8_L [mm] "SOIC, 8-Leads, Body 4.9x3.9mm, Pitch 1.27mm, Thermal Pad, IPC High Density"
  oval 1.8x0.6 smd: 1(-2.4,1.905) 2(-2.4,0.635) 3(-2.4,-0.635) 4(-2.4,-1.905) 5(2.4,-1.905) 6(2.4,-0.635) 7(2.4,0.635) 8(2.4,1.905)
  rect 2.4x3.1 smd paste-1.2: 9(0,0)
  silkscreen extent -2.47,2.63 -2.22,2.88, body extent -2,-2.5 2,2.5, height 1.75
MOLX-47219-2001-8_V [mm] "CONN, 8-Leads, Body 14.5x13.6mm, Pitch 1.1mm"
  rect 0.8x1.5 smd: 1(-3.205,1.55) 2(-2.105,1.55) 3(-1.005,1.55) 4(0.095,1.55) 5(1.195,1.55) 6(2.295,1.55) 7(3.395,1.55) 8(4.495,1.55)
  rect 1.45x2 smd: 9(6.875,4.15) 10(6.875,-4.15) 11(-6.875,-4.15) 12(-6.875,4.15)
  body extent -7.3,-7.79 7.3,6.71, height 1.91
MOLX-52746-2071 [mm] "FPC Connector, 20-Leads, Right Angle, Pitch 0.5 mm, Mated Height 2.0 mm, SMT"
  rect 0.3x0.8 smd: 1(-4.75,0.824) 2(-4.25,0.824) 3(-3.75,0.824) 4(-3.25,0.824) 5(-2.75,0.824) 6(-2.25,0.824) 7(-1.75,0.824) 8(-1.25,0.824) 9(-0.75,0.824) 10(-0.25,0.824) 11(0.25,0.824) 12(0.75,0.824) 13(1.25,0.824) 14(1.75,0.824) 15(2.25,0.824) 16(2.75,0.824) 17(3.25,0.824) 18(3.75,0.824) 19(4.25,0.824) 20(4.75,0.824)
  rect 1x1 smd: MP1(-7.134,-0.824) MP2(7.134,-0.824)
  Top Layer region: -8.4,0.424 -6,0.424 -6,-2.626 -6,-2.626 -7.3,-2.626 -7.3,-1.777 -7.3,-1.776 -8.4,-1.776
  Top Layer region: 6,0.424 8.4,0.424 8.4,-1.776 8.4,-1.777 7.3,-1.777 7.3,-2.626 6,-2.626 6,0.424
  silkscreen extent -4.87,1.65 -4.63,1.9, body extent -8.05,-5.68 8.05,0.92, height 2.01
NSL254M-5G [mm] "5pin, 2.54mm THT connector"
  round 1.6 hole 1: 1(-5.08,0) 2(-2.54,0) 3(0,0) 4(2.54,0) 5(5.08,0)
NSL254M-8G [mm] "8pin, 2.54mm THT connector"
  round 1.6 hole 1: 1(-8.89,0) 2(-6.35,0) 3(-3.81,0) 4(-1.27,0) 5(1.27,0) 6(3.81,0) 7(6.35,0) 8(8.89,0)
PWR_logo_20x4.5 [mm]
  silkscreen extent -9.92,-2.19 9.92,2.19
RESISTOR_SMD_0603 [mil]
  rect 40x30 smd: 1(0,-33.46) 2(0,33.46)
  body extent -18,-33 18,33, height 22
STM-LQFP64_M [mm] "Thin QFP, 64-Leads, Body 10x10mm, Pitch 0.5mm, IPC Low Density"
  oval 2.1x0.3 smd: 1(-5.6,3.75) 2(-5.6,3.25) 3(-5.6,2.75) 4(-5.6,2.25) 5(-5.6,1.75) 6(-5.6,1.25) 7(-5.6,0.75) 8(-5.6,0.25) 9(-5.6,-0.25) 10(-5.6,-0.75) 11(-5.6,-1.25) 12(-5.6,-1.75) 13(-5.6,-2.25) 14(-5.6,-2.75) 15(-5.6,-3.25) 16(-5.6,-3.75) 33(5.6,-3.75) 34(5.6,-3.25) 35(5.6,-2.75) 36(5.6,-2.25) 37(5.6,-1.75) 38(5.6,-1.25) 39(5.6,-0.75) 40(5.6,-0.25) 41(5.6,0.25) 42(5.6,0.75) 43(5.6,1.25) 44(5.6,1.75) 45(5.6,2.25) 46(5.6,2.75) 47(5.6,3.25) 48(5.6,3.75)
  oval 0.3x2.1 smd: 17(-3.75,-5.6) 18(-3.25,-5.6) 19(-2.75,-5.6) 20(-2.25,-5.6) 21(-1.75,-5.6) 22(-1.25,-5.6) 23(-0.75,-5.6) 24(-0.25,-5.6) 25(0.25,-5.6) 26(0.75,-5.6) 27(1.25,-5.6) 28(1.75,-5.6) 29(2.25,-5.6) 30(2.75,-5.6) 31(3.25,-5.6) 32(3.75,-5.6) 49(3.75,5.6) 50(3.25,5.6) 51(2.75,5.6) 52(2.25,5.6) 53(1.75,5.6) 54(1.25,5.6) 55(0.75,5.6) 56(0.25,5.6) 57(-0.25,5.6) 58(-0.75,5.6) 59(-1.25,5.6) 60(-1.75,5.6) 61(-2.25,5.6) 62(-2.75,5.6) 63(-3.25,5.6) 64(-3.75,5.6)
  silkscreen extent -5.72,4.33 -5.47,4.57, body extent -5,-5 5,5, height 1.6
WE-MAPI_2510 [mm] "SMT Shielded Power Inductor, body 2.50 x 2.00 mm"
  rect 0.85x2.3 smd: 1(-0.975,0) 2(0.975,0)
  Top Layer keep-out region: -0.55,1.15 0.55,1.15 0.55,-1.15 -0.55,-1.15
  body extent -1.25,-1 1.25,1, height 1.01
WE-MAPI_5030 [mm] "SMD Power Inductor, 2-leads, body 5.40 x 5.40 mm"
  rect 1.7x5.6 smd: 1(-1.95,0) 2(1.95,0)
  Top Layer keep-out region: -1.1,2.8 1.1,2.8 1.1,-2.8 -1.1,-2.8
  body extent -2.7,-2.7 2.7,2.7, height 3.1

## Part data
B1: "5V buzzer"
C1 C2 C6 C7 C8 C14 C15 C16 C17 C18 C20 C21 C22 C23 C24 C25 C26 C27 C28 C29 C30 C31 C32 C33 C34 C35 C36 C37 C38 C39 C40 C41 C42 C43 C44: "0603 capacitor"
C3 C4: library part CMP-05427-000066-1, "CAP ALUM 47UF 20% 63V RADIAL", Capacitance=47uF, Case/Package=Radial, ESR (Equivalent Series Resistance)=210mR, Max Operating Temperature=105°C, Min Operating Temperature=-40°C, Package Quantity=200, Ripple Current=284mA, Tolerance=20%, Voltage=63V, Construction=Cylindrical, Contact Plating=Tin, Diameter=6.3mm, Height=11.2mm, Height - Seated (Max)=0.5inch, Impedance=210mR, Lead Diameter=0.5mm, Lead Free="Lead Free", Lead Pitch=2.5mm, Length=11.2mm, Life (Hours)=5000Hour, Mount="Through Hole", Packaging=Bulk, Radiation Hardening=No, REACH SVHC="No SVHC", Ripple Current (AC)=284mA, RoHS Compliant=Yes, Series=FR, Termination=Radial, Voltage Rating=63V, Voltage Rating (DC)=63V
C5 C9 C10 C12 C13: "1206 capacitor"
D1 D2: library part CMP-14398-000026-1, "DIODE SCHOTTKY 40V 3A SOD123W", RoHS Compliant=Yes
D3 D4 D5 D6 D7 D8 D9: "0603 LED"
D10 D11 D12 D13 D14 D15: library part CMP-00278-47358424-1, "ESD7351HT1G ESD7351 Series 5 V 0.6 pF Uni-Directional ESD Protection Diode - SOD-323", Breakdown Voltage=5V, Capacitance=430fF, Case/Package=SOD, Clamping Voltage=10V, Manufacturer Lifecycle Status=ACTIVE, Max Junction Temperature (Tj)=150°C, Min Operating Temperature=-55°C, Peak Pulse Current=3A, Peak Pulse Power=150mW, Power Line Protection=No, Reverse Standoff Voltage=3.3V, Composition=Zener, Direction=Unidirectional, Height=1mm, Lead Free="Lead Free", Lifecycle Status=Production, Max Operating Temperature=150°C, Min Breakdown Voltage=5V, Mount="Surface Mount", NexarPartId=47358424, Number Of Channels=1, Number of Unidirectional Channels=1, Packaging="Tape & Reel (TR)", RoHS=Compliant, Schedule B=8536300000
J1 J3 J8 J9 J10 J11: library part CMP-2000-05888-3, "CONN HEADER VERT 2POS 2.5MM", Color=Natural, Contact Resistance=20mR, Current Rating=3A, Housing Color=White, Insulation Resistance=1GR, Max Operating Temperature=85°C, Max Voltage Rating (AC)=250V, Min Operating Temperature=-25°C, Connector Type="Male Pin", Contact Material=Brass, Contact Plating=Tin, Contact Type="Male Pin", Depth=5.75mm, Fastening Type=Detent, Housing Material=Polyamide, Lead Free="Lead Free", Lead Pitch=2.5mm, Length=7.4mm, Max Current Rating=3A, Max Voltage Rating (DC)=250V, Mount="Through Hole", Number of Contacts=2, Number of Positions=2, Number Of Rows=1, Orientation=Straight, Packaging=Bulk, Pitch=2.5mm, REACH SVHC="No SVHC", Series=XH, Termination=Solder, Voltage Rating=250V, Voltage Rating (AC)=250V, Wire/Cable Gauge=22AWG
J2: library part CMP-1241-00382-1, "0.5 mm Pitch Easy-On(TM) Type FPC Connector, 2.0 mm Mated Height, Right Angle, ZIF, SMT, Bottom Contact, 20 Circuits, -20 to 85 degC, ELV and RoHS Compliant, Tape and Reel", Current (Max per Contact)=0.5A, Manufacturer=Molex, Voltage (Max)=50V, Circuits (Loaded)=20, ComponentLink1Description="Manufacturer URL", ComponentLink1URL=http://www.molex.com/molex/index.jsp, ComponentLink2Description=Datasheet, ComponentLink2URL=http://www.molex.com/webdocs/datasheets/pdf/en-us/0527462071_FFC_FPC_CONNECTORS.pdf, ComponentLink3Description="Package Specification", ComponentLink3URL=http://www.molex.com/pdm_docs/sd/527462071_sd.pdf, Contact Position=Bottom, Durability (mating cycles max)=20, Entry Angle="90degrees Angle", Mated Height=2.00mm, Material - Metal="Phosphor Bronze", Material - Plating Mating=Gold, Material - Plating Termination=Gold, Mounting Technology="Surface Mount", Number Of Rows=1, Orientation="Right Angle", PackageDescription="20-Lead FPC Connector, Pitch 0.5 mm", PackageReference=52746-2071, PackageVersion="Rev. H, 05/2009", Packing="Tape and Reel", PartNumber=52746-2071, PCB Locator=No, PCB Retention=Yes, Pitch - Mating Interface=0.50mm, Polarized to PCB=Yes, RoHS=TRUE, Stackable=No
J4: "7pin, 2.54mm THT connector"
J5: "5pin, 2.54mm THT connector"
J6: library part CMP-2000-05476-3, "CONN HEADER VERT 6POS 1.25MM", Current Rating=1A, Manufacturer=Molex, Package=0, Temperature="-40°C to +85°C", Temperature Range High=+85°C, Temperature Range Low=-40°C, Voltage Rating=125V, Automotive=No, Category=Conn, ComponentLink2Description=Datasheet, ComponentLink2URL=https://www.molex.com/webdocs/datasheets/pdf/en-us/0530470610_PCB_HEADERS.pdf, Conn Gender=Male, Conn Orientation=Vertical, Contact Material=Tin, Device Class L1=Connectors, Device Class L2="Headers and Wire Housings", Device Class L3=unset, Digikey Description="CONN HEADER VERT 6POS 1.25MM", Footprint Url=https://www.molex.com/pdm_docs/sd/530470610_sd.pdf, Height=4.4mm, Lead Free=Yes, Manufacturer Part Number=530470610, Mouser Description="Headers & Wire Housings VERTICAL HDR 6P", Number of Contacts=6, Number Of Rows=1, Octopart=https://octopart.com/53047-0610-molex-276776, Pitch=1.25mm, RoHS=TRUE
J7: library part CMP-17439-000304-1, "CONN HEADER VERT 5POS 2.5MM", Color=Green, Contact Resistance=20mR, Flammability Rating="UL94 V-0", Housing Color=White, Insulation Color=Natural, Max Current Rating=3A, Max Operating Temperature=85°C, Max Voltage Rating (AC)=250V, Min Operating Temperature=-25°C, Connector Type=Header, Contact Finish - Mating=TIN, Contact Material=Brass, Contact Plating=Copper, Contact Shape=Square, Contact Type="Male Pin", Depth=5.75mm, Fastening Type=Detent, Housing Material=Polyamide, Insulation Material=Nylon, Lead Free="Lead Free", Length=14.9mm, Mated Stacking Heights=9.8mm, Mount="Through Hole", Number of Positions=5, Number Of Rows=1, Orientation=Straight, Packaging=Bulk, Pitch=2.5mm, Series=XH, Termination=Solder, Voltage Rating=250V
J12 J13: library part CMP-17439-000014-3, "CONN HEADER VERT 3POS 2.5MM", Color=Natural, Contact Resistance=20mR, Current Rating=3A, Flammability Rating="UL94 V-0", Housing Color=White, Insulation Resistance=1GR, Max Operating Temperature=85°C, Max Voltage Rating (AC)=250V, Min Operating Temperature=-25°C, Connector Type=Header, Contact Finish - Mating=TIN, Contact Material=Brass, Contact Plating=Tin, Contact Shape=Square, Contact Type="Male Pin", Depth=5.75mm, Fastening Type=Detent, Gender=Male, Housing Material=Polyamide, Insulation Color=Natural, Insulation Material=Nylon, Lead Free="Lead Free", Lead Pitch=2.5mm, Length=9.9mm, Max Current Rating=3A, Max Voltage Rating (DC)=250V, Mount="Through Hole", Number of Contacts=3, Number of Positions=3, Number Of Rows=1, Orientation=Straight, Packaging=Bulk, Pitch=2.5mm, REACH SVHC="No SVHC", Series=XH, Termination=Solder, Voltage Rating=250V, Voltage Rating (AC)=250V, Wire/Cable Gauge=22AWG
L1: library part CMP-03913-130924348-3, "Power Inductor, 10Uh, Shielded, 4.8A Rohs Compliant: Yes", Ambient Temperature Range High=85°C, Ambient Temperature Range Low=-40°C, Current Rating=3.3A, DC Resistance (DCR)=61mΩ, Inductance=10µH, Max Operating Temperature=125°C, Height=3.1mm, Length=5.4mm, Min Operating Temperature=-40°C, RoHS=Compliant, Width=5.4mm
L2: library part CMP-1411-00006-4, "Inductor Power Shielded Wirewound 2.2uH 20% 100KHz Powdered Iron 1.3A 176mOhm DCR 1008 T/R", Ambient Temperature Range High=85°C, Ambient Temperature Range Low=-40°C, Case Code (Imperial)=1008, Case Code (Metric)=2520, Case/Package=SMD/SMT, Current Rating=1.3A, DC Resistance (DCR)=147mΩ, Inductance=2.2µH, Inductance Tolerance=20%, Max Operating Temperature=125°C, Saturation Current=2.5A, Self Resonant Frequency=60MHz, Test Frequency=100kHz, Core Material="Composite, Ferrite, Metal", Depth=2mm, Height=1mm, Height - Seated (Max)=990.6µm, Length=2.5mm, Max DC Current=1.3A, Min Operating Temperature=-40°C, Mount="Surface Mount", Number of Pins=2, REACH SVHC=Unknown, RMS Current (Irms)=1.3A, RoHS=Compliant, Series Resistance=147mΩ, Shielding=Shielded, Termination=SMD/SMT, Tolerance=20%, Weight=32.006612mg, Width=2mm
Q1 Q3 Q6: library part CMP-14406-000042-1, "TRANS PNP 45V 500MA TO236AB", RoHS Compliant=Yes
Q2 Q4 Q5 Q7: library part CMP-14406-000007-1, "TRANS NPN 45V 0.5A SOT23", Ambient Temperature Range High=+150°C, Ambient Temperature Range Low=-65°C, Collector Base Voltage=50V, Collector Emitter Breakdown Voltage=45V, Collector Emitter Saturation Voltage=700mV, Emitter Base Voltage=5V, Manufacturer=Nexperia, Max Collector Current=500mA, Package=SOT23, Power Dissipation=250mW, Temperature="to +150°C", Unity Gain Freq=100MHz, Automotive=Yes, Automotive Grade="Grade 0", Category=Trans, Collector Emitter Voltage=45V, ComponentLink2Description=Datasheet, ComponentLink2URL=https://assets.nexperia.com/documents/data-sheet/BC817_SER.pdf, Device Class L1="Discrete Semiconductors", Device Class L2=Transistors, Device Class L3=BJTs, Digikey Description="TRANS NPN 45V 0.5A SOT23", Footprint Url=https://assets.nexperia.com/documents/outline-drawing/SOT23.pdf, Height=1.1mm, Hfe Max=600, Hfe Min=250, Hfe Testic=100mA, Hfe Testvce=1V, Ipc Land Pattern Name=SOT95P230X100-3, Lead Free=Yes, Manufacturer Part Number=BC817-40,215, Max Junction Temp=+150°C, Mouser Description="BC817 Series 45 V 500 mA 250 mW SMT NPN General-Purpose Transistor - SOT-23-", Number Of Elements=1, Number Of Npn=1, Octopart=https://octopart.com/bc817-40%2C215-nexperia-78739081, RoHS=TRUE, Rthja Max=500K/W, Temperature Range High=+150°C
R1 R2 R3 R4 R5 R6 R7 R8 R9 R10 R11 R12 R13 R14 R15 R16 R17 R18 R19 R20 R21 R22 R23 R24 R25 R26 R27 R28 R29 R30 R31 R32 R33 R34 R35 R36 R37 R38 R39 R40 R41 R42 R43 R44 R45 R46 R47 R48 R49 R50 R51 R52 R53 R54 R55 R56 R57 R58 R59 R60 R61 R62 R63 R64 R65 R66 R67 R68 R69 R70 R71 R72: "0603 resistor"
SD1: library part CMP-2000-05245-1, "MicroSD Card Connector, Hinge Type, -40 to 85 degC, 8-Pin SMD, RoHS, Tape and Reel", Current Rating=500mA, Manufacturer=Molex, Voltage Rating=100VDC, Brand=Molex, Card Type=microSD, Contact Material=CopperAlloy, Datasheet URL=http://www.molex.com/pdm_docs/sd/472192001_sd.pdf, Datasheet Version="Rev. F, 06/2009", Factory Pack Quantity=2400, Housing Material=Thermoplastic, Insertion - Extraction Style=Hinged, Manufacturer URL=http://www.molex.com/, Mounting Style=SMD/SMT, Number of Contacts=8, Packaging=Reel, Pitch=1.09mm, Product=CardConnectors, Product Category=MemoryCardConnectors, RoHS=Details, Series=47219, Termination Style=SMD
U1: library part CMP-0240-00043-1, "Up to 3 A step down switching regulator, 8-Pin HSOP", ComponentLink1Description="Manufacturer URL", ComponentLink1URL=http://www.st.com, ComponentLink2Description=Datasheet, ComponentLink2URL=http://www.st.com/internet/com/TECHNICAL_RESOURCES/TECHNICAL_LITERATURE/DATASHEET/CD00285678.pdf, DatasheetVersion=Oct-2010, PackageDescription="8-Pin Small Outline Integrated Circuit 1.27 mm Pitch", PackageReference=HSO-8, PackageVersion=2007
U2: library part CMP-0323-00319-3, "Buck Step Down Regulator with 3 to 17 V Input and 3.3 V Output, -40 to 85 degC, 8-Pin WSON (DSG), Green (RoHS & no Sb/Br)", Manufacturer="Texas Instruments", PartNumber=TPS62162DSGT, Rating=Catalog, Switch Current Limit(Typ)(A)=1.8, Code_JEDEC=MO-229, ComponentLink1Description=Datasheet, ComponentLink1URL=http://www.ti.com/general/docs/lit/getliterature.tsp?genericPartNumber=TPS62162&fileType=pdf, ComponentLink2Description="Package Specification", ComponentLink2URL=http://www.ti.com/litv/pdf/mpds308a, ComponentLink3Description="URL Link1", ComponentLink3URL="Samples URL:http://www.ti.com/product/tps54611#samples", DatasheetVersion=SLVSAM2A, Duty Cycle(Max)(%)=100, Eco-Plan="Green (RoHS & no Sb/Br)", Iout(Max)(A)=1, Iq(Typ)(mA)=0.017, Mounting Technology="Surface Mount", PackageDescription="8-Pin Plastic Small Outline No-Lead, 2 x 2 x 0.8 mm Body, 0.5 mm Pitch, Exposed Pad", PackageReference=DSG0008A, PackageVersion="revB, Oct-2010", Preset Vout(V)=3.3, Regulated Outputs(#)=1, SubFamily="Step-Down Regulator", Synchronous Rectification=TRUE, Topology=Buck, Vin(Max)(V)=17, Vin(Min)(V)=3, Vout(Max)(V)=3.3, Vout(Min)(V)=3.3
U3: library part CMP-0243-00019-3, "ARM Cortex-M4 32-bit MCU+FPU, 210 DMIPS, 1024 kB Flash, 192 kB Internal RAM, 51 I/Os, 64-pin LQFP, -40 to 85 degC, Tray", I/Os (High Current)=51, Manufacturer=STMicroelectronics, Operating Frequency(F) (Processor speed) (MHz)=168, Supply Voltage(Vcc) max (V)=3.6, Supply Voltage(Vcc) min (V)=1.8, ComponentLink1Description="Manufacturer URL", ComponentLink1URL=http://www.st.com/web/en/home.html, ComponentLink2Description=Datasheet, ComponentLink2URL=http://www.st.com/st-web-ui/static/active/en/resource/technical/document/datasheet/DM00037051.pdf, ComponentLink3Description="Package Specification", ComponentLink3URL=http://www.st.com/st-web-ui/static/active/en/resource/technical/document/datasheet/DM00037051.pdf, Core="ARM Cortex-M4", D/A Converter=2x12-bit, DatasheetVersion="Rev. 4", FLASH Size (Prog) (kB)=1024, Internal RAM Size (kB)=192, Mounting Technology="Surface Mount", PackageDescription="64-Pin Low Profile Quad Flat Package, 10 x 10 mm Body, 0.5 mm Pitch", PackageReference=LQFP64, PackageVersion="Rev. 4, 06/2013", Packing=Tray, PartNumber=STM32F405RGT6
U4 U5 U6 U7: library part CMP-0272-00993-4, "IC OPAMP GP 1 CIRCUIT SOT23-5", Case/Package=SOT-23, Input Bias Current=10pA, Input Offset Voltage (Vos)=5mV, Max Operating Temperature=125°C, Max Supply Voltage=5.5V, Min Operating Temperature=-40°C, Min Supply Voltage=2.5V, Nominal Supply Current=65uA, Operating Supply Current=45uA, Output Current per Channel=10mA, Package Quantity=3000, Power Supply Rejection Ratio (PSRR)=84.44dB, Voltage Gain=108dB, Bandwidth=1MHz, Common Mode Rejection Ratio=70dB, Contact Plating=Gold, Gain Bandwidth Product=1MHz, Height=1.15mm, Lead Free="Lead Free", Length=2.9mm, Max I/O Voltage=5mV, Nominal Gain Bandwidth Product=1MHz, Number of Amplifiers=1, Number Of Channels=1, Number of Circuits=1, Number Of Elements=1, Number of Pins=5, Packaging="Tape and Reel", Radiation Hardening=No, REACH SVHC="No SVHC", Slew Rate=0.5V/µs, Unity Gain Bandwidth Product=1MHz, Width=1.6mm
Y1: library part Crystal, "SMD 16MHz crystal"
Y2: library part "Crystal 32.768kHz", "Crystal 32.768kHz 3.2mm x 1.5mm", Case/Package=SMD/SMT, ESR (Equivalent Series Resistance)=50kR, Frequency=32.768kHz, Frequency Tolerance=20ppm, Load Capacitance=6pF, Max Operating Temperature=85°C, Min Operating Temperature=-40°C, Height=0.035inch, Length=0.126inch, Mount="Surface Mount", Packaging="Cut Tape", RoHS Compliant=Yes, Series=ABS07-LR, Width=0.061inch
?: library part PWR_logo_20x4.5

## Free pads (board coordinates)
  round 3.5 hole 3.5 unplated: ""(5,5) ""(93,5) ""(93,81)

## Via types
v1: diameter 0.6, hole 0.4, Top Layer to Bottom Layer, tented both sides, 472 vias

## Nets (pads, with @x,y where several pads share a name; then routed paths per layer and width w, separated by ;. In a path a pad name is that pad's centre, name@x,y a point inside that pad or via, vN(x,y) a via of type N, cw(c..) or ccw(c..) an arc to the next point about the centre after c; other vN are vias at no path point)
3V3: C11.1 C12.1 C13.1 C15.1 C19.1 C20.1 C21.1 C22.1 C23.1 C28.1 C29.1 C30.1 C35.1 C37.1 C39.1 C41.1 C43.1 C44.1 J2.20 J4.6 J5.3 J6.1 J7.5 L2.2 R6.2 R9.2 R10.2 R11.2 R12.2 R13.2 R26.2 R27.1 R34.2 R35.1 R42.2 R43.1 R50.2 R51.1 R64.2 R65.2 R66.2 R67.2 R68.2 SD1.4 U2.6 U3.13 U3.19 U3.32 U3.48 U3.64 U4.5 U5.5 U6.5 U7.5 | length 374.1
  Top Layer w0.3: U4.5@14.95,13.85 14.95,13.494 15.094,13.35 C35.1@16.6,13.35 ; R27.1@16.6,12.15 C35.1@16.6,13.35 ; v1(17.9,13.3) 17.875,13.325 16.625,13.325 C35.1@16.6,13.35 ; U5.5@27.45,13.85 27.45,13.494 27.594,13.35 C37.1@29.1,13.35 ; R35.1@29.1,12.15 C37.1@29.1,13.35 ; v1(30.431,13.3) 30.406,13.325 29.125,13.325 C37.1@29.1,13.35 ; U6.5@39.95,13.85 39.95,13.494 40.094,13.35 C39.1@41.6,13.35 ; R43.1@41.6,12.15 C39.1@41.6,13.35 ; v1(42.931,13.3) 42.906,13.325 41.625,13.325 C39.1@41.6,13.35 ; U7.5@52.45,13.85 52.45,13.494 52.594,13.35 C41.1@54.1,13.35 ; R51.1@54.1,12.15 C41.1@54.1,13.35 ; v1(55.5,13.3) 55.475,13.325 54.125,13.325 C41.1@54.1,13.35 ; U3.13@55.7,46.85 57.55,46.85 v1(57.6,46.8) ; J5.3@56.5,62 56.5,59.86 57.16,59.2 R11.2@58.05,59.2 ; v1@56.8,54.826 v1(56.8,54.8) 57.55,54.8 U3.64@57.55,54.7 ; v1(57.9,41.5) 58.55,42.15 U3.19@58.55,43.5 ; R10.2@62.65,59.2 62.675,59.225 62.675,60.275 v1(62.7,60.3) ; U3.32@65.05,43.5 v1(65.9,43.5) ; U3.48@66.9,52.85 v1(66.9,53.5) ; R9.2@69.95,15.5 69.975,15.525 69.975,16.475 v1(70,16.5) ; L2.2@71.625,4.8 71.687,4.737 R6.2@71.687,2.363 ; SD1.4@74.105,75.85 74.118,75.863 74.118,77.049 v1(74.131,77.062) ; v1(85.131,72.962) v1@85.153,72.984 ; R64.2@85.153,80.403 R64.2@85.175,80.425 ; J2.20@89.176,65.75 91.25,65.75 v1(91.3,65.8)
  Top Layer w0.6: v1(59.8,35.4) 59.8,23.541 63.5,19.841 v1(63.5,7) 63.5,5.7 64.4,4.8 L2.2@71.625,4.8 ; R6.2@71.687,2.363 R6.2@71.75,2.3 ; v1@85.153,72.984 R64.2@85.153,80.403 ; J4.6@91.3,46.5 91.3,29.725 J7.5@93.825,27.2
  Bottom Layer w0.3: J5.3@56.5,62 58.2,60.3 v1(62.7,60.3)
  Bottom Layer w0.6: R26.2@15.35,7 24.131,7 27.85,10.719 ; v1(17.9,13.3) v1(30.431,13.3) ; R34.2@27.85,7 27.85,10.719 ; R42.2@40.35,7 40.35,10.719 v1(42.931,13.3) ; R13.2@45.45,35 R12.2@45.45,36.4 45.45,38.125 J6.1@45.425,38.15 52.35,38.15 55.7,41.5 v1(57.9,41.5) ; R50.2@52.85,7 52.85,10.65 v1(55.5,13.3) ; J5.3@56.5,62 58.51,64.01 63.91,64.01 70.714,70.814 70.714,74.192 73.584,77.062 v1(74.131,77.062) 77.4,77.062 79.1,77.062 81.031,77.062 v1(85.131,72.962) 91.259,66.834 91.259,65.841 v1(91.3,65.8) 91.259,65.759 J4.6@91.259,46.541 ; v1(57.6,46.8) 56.8,47.6 v1(56.8,54.8) 57.95,54.8 C23.1@58,54.85 58.081,54.769 65.631,54.769 v1(66.9,53.5) C22.1@66.9,52.5 ; C21.1@64.719,43.469 C21.1@64.8,43.55 ; C22.1@66.95,52.5 66.869,52.419 66.869,51.954 66.859,51.944 66.859,44.4 65.959,43.5 v1(65.9,43.5) 59.9,43.5 v1(57.9,41.5) ; v1(70,16.5) 63.5,10 v1(63.5,7) 57.2,13.3 v1(55.5,13.3) ; J4.6@91.3,46.441 88.259,43.4 83,43.4 75,35.4 v1(59.8,35.4) 57.9,37.3 v1(57.9,41.5) ; 27.85,10.719 v1(30.431,13.3) ; v1(30.431,13.3) v1(42.931,13.3) ; v1(42.931,13.3) v1(55.5,13.3)